# Altium PCB IMU Product.PcbDoc (part 2 of 2)
Units mil, origin at the board's own origin, x right, y up, seen from the top; angles counter-clockwise.
Board outline 944.97 x 945.36 mil, 4 copper layers (Top Layer, Layer 1, Layer 2, Bottom Layer), stack 62.63 mil thick; 58 components, 40 nets, 205 pads, 53 vias.
Unrouted connection lines stored in the file: 29.
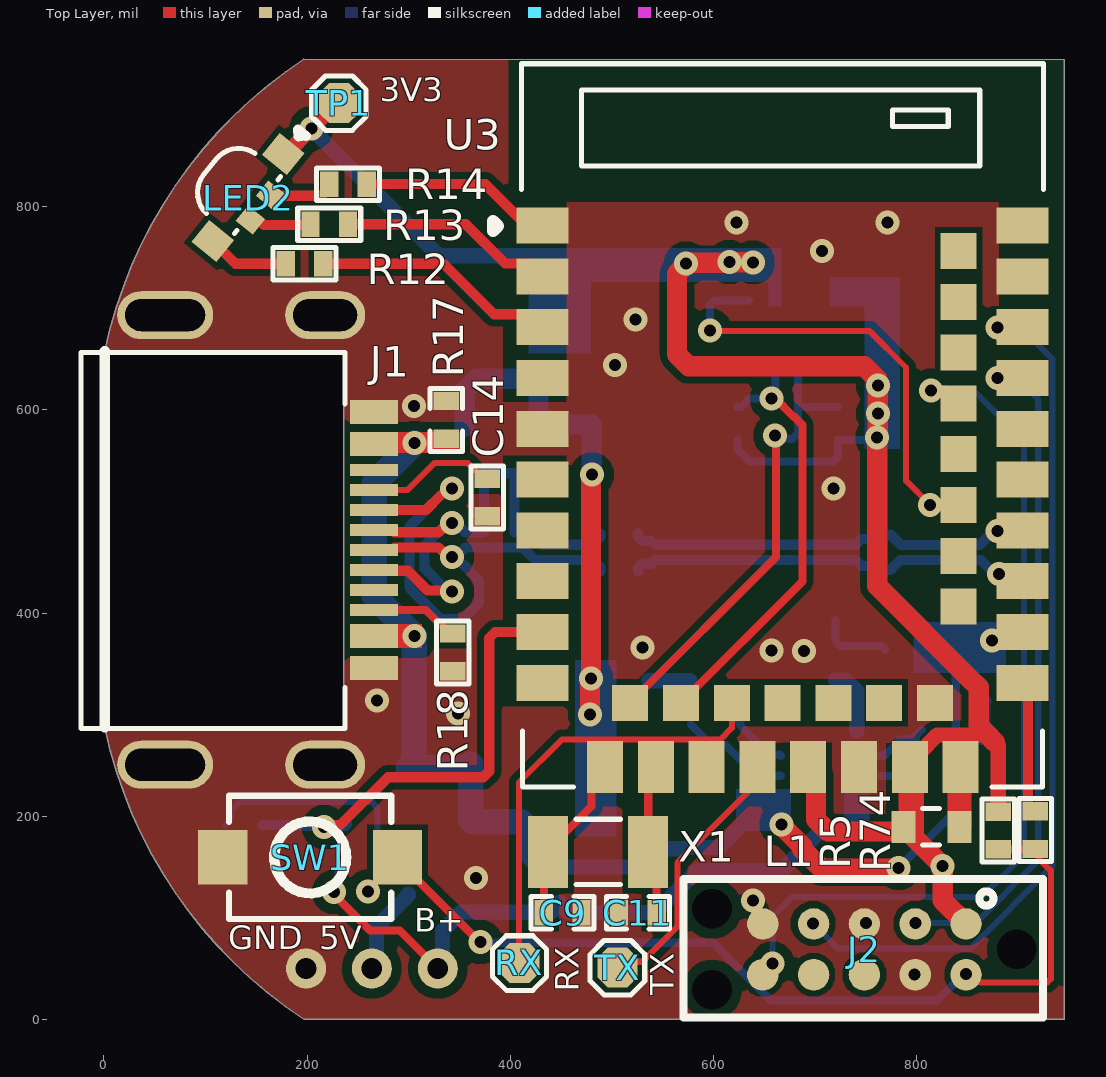
[diagram p0: Top Layer view]

## Part data (continued)
R20: library part RC0402FR-072KL, "RES 2K OHM 1% 1/16W 0402", Case Code (Imperial)=0402, Case Code (Metric)=1005, LCSC Part Number=C60488, Manufacturer=Yageo, Max Operating Temperature=155°C, Max Power Dissipation=63mW, Min Operating Temperature=-55°C, Package Quantity=1, Resistance Tolerance=1%, Resistor Type="Thick Film", Supplier Part Number=7970452, Temperature Coefficient=100ppm/°C, Voltage Rating=50V, Case/Package=0402, Category="Chip SMD Resistors", ComponentLink1Description=https://datasheet.ciiva.com/11808/0900766b80c66297-11808787.pdf?src-supplier=Rs, ComponentLink1URL=https://datasheet.ciiva.com/11808/0900766b80c66297-11808787.pdf?src-supplier=Rs, ComponentLink2Description=https://datasheet.ciiva.com/11808/0900766b80c66297-11808787.pdf?src-supplier=Rs, ComponentLink2URL=https://datasheet.ciiva.com/11808/0900766b80c66297-11808787.pdf?src-supplier=Rs, ComponentLink3Description=https://datasheet.ciiva.com/7849/1018594-7849934.pdf?src-supplier=Element14, ComponentLink3URL=https://datasheet.ciiva.com/7849/1018594-7849934.pdf?src-supplier=Element14, ComponentLink4Description=https://datasheet.ciiva.com/7849/1018594-7849935.pdf?src-supplier=Element14, ComponentLink4URL=https://datasheet.ciiva.com/7849/1018594-7849935.pdf?src-supplier=Element14, ComponentLink5Description=https://datasheet.ciiva.com/7983/1018594-7983517.pdf?src-supplier=Element14, ComponentLink5URL=https://datasheet.ciiva.com/7983/1018594-7983517.pdf?src-supplier=Element14, ComponentLink6Description=https://datasheet.ciiva.com/2453/pyu-r-int-thick-7-2453635.pdf?src-supplier=Digi-Key, ComponentLink6URL=https://datasheet.ciiva.com/2453/pyu-r-int-thick-7-2453635.pdf?src-supplier=Digi-Key, ComponentLink7Description=https://datasheet.ciiva.com/2453/pyu-r-int-thick-7-2453636.pdf?src-supplier=Digi-Key, ComponentLink7URL=https://datasheet.ciiva.com/2453/pyu-r-int-thick-7-2453636.pdf?src-supplier=Digi-Key, ComponentLink8Description=https://datasheet.ciiva.com/2453/pyu-r-int-thick-7-2453634.pdf?src-supplier=Digi-Key, ComponentLink8URL=https://datasheet.ciiva.com/2453/pyu-r-int-thick-7-2453634.pdf?src-supplier=Digi-Key, ComponentLink9Description=https://datasheet.ciiva.com/12667/pyu-rc0402-51-rohs-l-6-r-12667451.pdf?src-supplier=Mouser, ComponentLink9URL=https://datasheet.ciiva.com/12667/pyu-rc0402-51-rohs-l-6-r-12667451.pdf?src-supplier=Mouser, ComponentLink10Description=https://datasheet.ciiva.com/15189/getdatasheetpartid-358921-15189414.pdf?src-supplier=Verical, ComponentLink10URL=https://datasheet.ciiva.com/15189/getdatasheetpartid-358921-15189414.pdf?src-supplier=Verical, ComponentLink11Description=https://datasheet.ciiva.com/2453/pyu-r-int-thick-7-2453635.pdf?src-supplier=Digikey, ComponentLink11URL=https://datasheet.ciiva.com/2453/pyu-r-int-thick-7-2453635.pdf?src-supplier=Digikey, ComponentLink12Description=https://datasheet.ciiva.com/2453/pyu-r-int-thick-7-2453636.pdf?src-supplier=Digikey, ComponentLink12URL=https://datasheet.ciiva.com/2453/pyu-r-int-thick-7-2453636.pdf?src-supplier=Digikey, ComponentLink13Description=https://datasheet.ciiva.com/2453/pyu-r-int-thick-7-2453634.pdf?src-supplier=Digikey, ComponentLink13URL=https://datasheet.ciiva.com/2453/pyu-r-int-thick-7-2453634.pdf?src-supplier=Digikey, Construction=Rectangular, Depth=0.5mm, Features="Moisture Resistant", Height=0.016inch, Item Type=Resistor, Lead Free=5697LeadFree, Length=0.039inch, Manufacturer Part Number=RC0402FR-072KL, Military Standard=Not, Number of Terminations=2, Packaging="Tape and Reel", Power Rating=63mW, Pricing="10000=0.0018, 100000=0.0011, 200000=0.0017, 300000=0.001, 750000=0.0016, 2000000=0.0009, 2500000=0.0016, 10000000=0.0014 (USD)", Reach SVHC Compliant=Unknown, RoHS=Yes, RoHS Compliant=Yes, Series=RC, Stock=8530000, Supplier="Future Electronics", Technology="THICK FILM", Termination=SMD/SMT, Tolerance=1%, Voltage Rating (DC)=50V, Width=0.02inch, Working Voltage=50V
R74: library part RC0402FR-070RL, "RES 0 OHM JUMPER 1/16W 0402", Case Code (Imperial)=0402, Case Code (Metric)=1005, LCSC Part Number=C106231, Manufacturer=Yageo, Max Operating Temperature=155°C, Max Power Dissipation=63mW, Min Operating Temperature=-55°C, Power Rating=62.5mW, Resistor Type="Thick Film", Supplier Part Number 1=603-RC0402FR-070RL, Temperature Coefficient=200ppm/°C, Tolerance=1%, Voltage Rating=50V, Case/Package=0402, ComponentLink1Description=https://datasheet.ciiva.com/8896/pyu-rc0402-51-rohs-l-6-8896149.pdf?src-supplier=Avnet, ComponentLink1URL=https://datasheet.ciiva.com/8896/pyu-rc0402-51-rohs-l-6-8896149.pdf?src-supplier=Avnet, ComponentLink2Description=https://datasheet.ciiva.com/16790/pyu-rc0402-51-rohs-l-6-r-16790444.pdf?src-supplier=Future+Electronics, ComponentLink2URL=https://datasheet.ciiva.com/16790/pyu-rc0402-51-rohs-l-6-r-16790444.pdf?src-supplier=Future+Electronics, Contact Plating=Tin,Matte, Features="Moisture Resistant", Height=0.35mm, Item Type=Resistors, Lead Free="Lead Free", Length=1mm, Manufacturer Part Number=RC0402FR-070RL, Mount="Surface Mount", Number of Terminations=2, Packaging="Tape and Reel", Pricing 1="1=0.10000, 10=0.01400, 50=0.01400, 100=0.00600, 1000=0.00300, 5000=0.00200, 10000=0.00100 (USD)", Radiation Hardening=No, Resistance=0R, RoHS=Yes, RoHS Compliant=Yes, Series=RC, Size Code=0402, Stock 1=8556842, Supplier 1=Mouser, Termination=SMD/SMT, Width=0.5mm
RX TP1 TX: "Test Point ON", Item Type="Test Point", Manufacturer Part Number="TEST POINT 0.5mm Dia"
SW1: "Without bracket 50mA 4mm 100000 Times 12V 160gf 3mm 2mm Round Button Standing paste SPST SMD Tactile Switches ROHS", LCSC Part Number=C720477, Manufacturer=XUNPU, Package=SMD, ComponentLink1Description=LCSC, ComponentLink1URL=https://www.lcsc.com/product-detail/Tactile-Switches_XUNPU-TS-1088-AR02016_C720477.html?s_z=n_TS-1088-AR02016, Item Type="Tactile Switch", Manufacturer Part Number=TS-1088-AR02016
TP2 TP3 TP4: "Test pad"
U1: "IC BATTERY MANAGEMENT", LCSC Part Number=C3682876, Manufacturer="Texas Instruments", Item Type=IC, Manufacturer Part Number=BQ25170JDSGR, Pricing="1=0.8, 10=0.513, 50=0.513, 100=0.42, 1000=0.387, 10000=0.343 (USD)", RoHS=No, Stock=3618, Supplier=Mouser
U2: "SOT-23-5 Linear Voltage Regulators (LDO) ROHS", LCSC Part Number=C3021084, Manufacturer="TECH PUBLIC", Package=SOT-23-5, ComponentLink1Description=LCSC, ComponentLink1URL=https://www.lcsc.com/product-detail/Linear-Voltage-Regulators-LDO_TECH-PUBLIC-XC6210B332MR_C3021084.html, Item Type=IC, Manufacturer Part Number=XC6210B332MR
U3: "Bluetooth Modules ROHS", LCSC Part Number=C356849, Manufacturer="Chengdu Ebyte Elec Tech", Package=Custom, ComponentLink1Description=LCSC, ComponentLink1URL=https://www.lcsc.com/product-detail/Bluetooth-Modules_Chengdu-Ebyte-Elec-Tech-E73-2G4M08S1C_C356849.html?s_z=n_E73-2G4M08S1C, Item Type=Module, Manufacturer Part Number=E73-2G4M08S1C
U4: "INEMO 3D ACCELEROMETER AND 3D GY", LCSC Part Number=C5267406, Manufacturer=STMicroelectronics, Max Operating Temperature=85°C, Max Supply Voltage=3.6V, Min Operating Temperature=-40°C, Min Supply Voltage=1.71V, Height=860um, Item Type=IC, Manufacturer Part Number=LSM6DSV16XTR, Pricing="5000=2.815 (USD)", RoHS=No, Stock=5000, Supplier="Arrow Electronics"
X1: "32.768kHz Surface Mount Crystal 12.5pF ±20ppm SMD3215-2P Crystals ROHS", LCSC Part Number=C32346, Manufacturer=Epson, ComponentLink1Description=https://datasheet.octopart.com/Q13FC13500004-Epson-datasheet-62043850.pdf?src-supplier=Farnell, ComponentLink1URL=https://datasheet.octopart.com/Q13FC13500004-Epson-datasheet-62043850.pdf?src-supplier=Farnell, ComponentLink2Description=https://datasheet.octopart.com/Q13FC13500004-Epson-datasheet-32025749.pdf?src-supplier=Newark, ComponentLink2URL=https://datasheet.octopart.com/Q13FC13500004-Epson-datasheet-32025749.pdf?src-supplier=Newark, Item Type=Crystals, Manufacturer Part Number=Q13FC13500004, Reach SVHC Compliant=4187SVHC, RoHS=Yes, Stock=52665, Supplier=Farnell

## Via types
v1: diameter 23.62, hole 11.81, Top Layer to Bottom Layer, 53 vias

## Nets (pads, with @x,y where several pads share a name; then routed paths per layer and width w, separated by ;. In a path a pad name is that pad's centre, name@x,y a point inside that pad or via, vN(x,y) a via of type N, cw(c..) or ccw(c..) an arc to the next point about the centre after c; other vN are vias at no path point)
3V3: C5.2 C6.2 C15.1 C16.1 J2.1 L1.2 LED2.1 R5.2 R8.2 R9.2 R19.1 TP1.1 U2.5 U3.19 U3.23 U4.5 U4.8 | length 1985.5
  Top Layer w15: LED2.1 179.03,851.79 v1(204.05,876.82) 229.08,901.84 TP1.1 ; U3.23 793.2,252.57 810.11,269.48 810.11,270.1 819.89,279.88 860.91,279.88 867.79,279.88 868.91,281.01 ; 876.91,273.01 880.22,269.7 R5.2
  Top Layer w20: v1(572.98,743.92) 572.98,742.94 563.95,733.9 563.95,654.5 575.66,642.78 748.18,642.78 761.02,629.95 761.02,624.84 v1(761.71,624.15) v1(761.71,596.29) v1@761.71,575.85 ; v1@574.17,743.44 574.17,744.13 574.66,744.62 613.64,744.62 614.21,745.18 v1@636.17,745.18 ; U3.19 700.91,240.94 700.91,196.72 712.63,185 794,185 794,182.25 v1(825.48,150.77) ; v1(761.1,572.66) 761.1,426.62 851.72,336 860.91,326.8 860.91,289.01 868.91,281.01 876.91,273.01 ; v1@826.17,151.46 v1(825.48,150.77) ; J2.1 825.48,117.02 v1(825.48,150.77)
  Bottom Layer w8: R9.2 623.75,561.21 635.96,549 717.77,549 722.45,553.69 R8.2 762.55,570.21 771,578.66 771,587 v1(761.71,596.29) 764.64,599.22 764.64,621.22 v1(761.71,624.15) 767.49,629.93 767.49,642.19 771,645.7 ; v1@761.1,570.21 v1(761.1,572.66)
  Bottom Layer w10: 470.33,751.7 470.4,751.63 470.4,725.25 C5.2 C6.2
  Bottom Layer w15: v1(204.05,876.82) 329.18,751.7 470.33,751.7 ; 448.7,703.56 470.4,725.25 470.4,742.03 471.9,743.53 ; 721.44,723.2 723.44,721.2
  other v1: 615.47,745.46 638.67,745.18
+5V: D1.1 TP3.1 | length 88.1
  Bottom Layer w15: TP3.1 268.31,54.78 268.31,91.14 299.57,122.4 D1.1@299.57,123.38
BLUE_LED: R14.2 U3.1 | length 189.9
  Top Layer w10: R14.2 375.26,822.11 416.03,781.34 U3.1
D_N: J1.A7 J1.B7 R15.1 | length 551.9
  Top Layer w10: J1.A7 283.55,462.16 285.89,464.5 329.42,464.5 332.42,461.5 ; J1.B7 317.22,501.53 331.32,515.62
  Bottom Layer w10: v1(342.42,455.08) 346.11,455.08 355.47,464.45 382.41,464.45 412.17,464.45 424.4,452.22 472.4,452.22 472.82,451.79 476.11,448.5 484.9,448.5 488.9,444.5 R15.1 ; v1(342.4,522.81) 338.71,522.81 331.53,515.62 331.32,515.62 300.61,484.92 300.61,424.98 331.32,394.27 353.53,394.27 369.23,409.98 369.23,432.19 353.53,447.89
D_P: J1.A6 J1.B6 R16.1 | length 539.4
  Top Layer w10: J1.B6 266.74,441.56 299.25,441.56 318.73,422.08 v1@342.42,422.08 ; J1.A6 283.55,481.84 285.89,479.5 329.42,479.5 338.74,488.81 v1(342.42,488.81)
  Bottom Layer w10: v1(342.42,421.08) 339.81,423.69 335.9,423.69 315.61,443.98 315.61,466.19 331.32,481.89 331.82,481.89 338.74,488.81 v1(342.42,488.81) 346.11,488.81 355.47,479.45 369.23,479.45 374.23,479.45 374.23,537.54 404.23,537.54 404.23,479.45 417.75,479.45 418.38,479.45 430.61,467.22 472.4,467.22 476.11,470.93 484.9,470.93 488.9,474.93 R16.1
GND: C1.2 C2.2 C3.1 C4.1 C5.1 C6.1 C7.1 C8.2 C9.1 C10.1 C11.1 C12.1 C13.1 C14.1 C15.2 C16.2 J1.A1 J1.A12 J1.B1 J1.B12 J1.S1 J1.S2 J1.S3 J1.S4 J2.3 J2.5 J2.9 R1.1 R2.2 R3.1 R4.2 R11.1 R17.1 R18.1 SW1.1 TP4.1 U1.4 U1.9 U2.2 U3.5 U3.21 U3.24 U4.1 U4.2 U4.3 U4.6 U4.7 | length 26.9
  Top Layer w8: v1(639.03,116.98) 639.03,112.75 644.1,107.68 644.1,98.4 J2.5
  other v1: 797.55,44.37 750.3,94.89 366.21,139.23 348.72,300.91 268.66,313.71 657.27,363.13 689.16,362.77 529.9,366.08 718,522.68 305.05,603.77 502.95,643.96 523.28,688.78 706.86,756.53 622.61,784.53 771,784.53
GREEN_LED: R13.2 U3.2 | length 212.8
  Top Layer w10: R13.2 356.14,782.74 394.83,744.06 419.06,744.06 U3.2
INT1: R19.2 U3.32 U4.4 | length 418.9
  Top Layer w6: v1(596.4,678.27) 596.97,677.71 753.39,677.71 789.41,641.69 789.41,606.61 789.46,606.57 789.46,529.99 v1(813.1,506.34)
  Bottom Layer w8: R19.2 600.64,707.58 U4.4 ; R19.2 596.4,702.09 v1(596.4,678.27)
NetC3_2: C3.2 R20.1 | length 40.8
  Bottom Layer w15: C3.2 R20.1@576.86,333.28
NetJ1_A5: J1.A5 R17.2 | length 128.7
  Top Layer w6: J1.A5 298.82,521.21 325.23,547.62 358.16,547.62 373.66,532.12 R17.2
NetJ1_B5: J1.B5 R18.2 | length 87.3
  Top Layer w8: J1.B5 316.74,403.1 340.01,379.83 R18.2
NetL1_1: L1.1 U3.25
NetLED1_1: LED1.1 R6.1 | length 72.9
  Bottom Layer w8: LED1.1 720.2,372.23 724.89,367.54 765.16,367.54 R6.1
NetLED2_2: LED2.2 R14.1 | length 64.8
  Top Layer w10: LED2.2 164.65,810.66 213.83,810.66 221.78,818.61 R14.1
NetLED2_3: LED2.3 R13.1 | length 61.5
  Top Layer w10: LED2.3 152.58,786.81 157.57,781.82 202.34,781.82 R13.1
NetLED2_4: LED2.4 R12.1 | length 81
  Top Layer w10: LED2.4 129.56,743.75 R12.1
NetLED3_1: LED3.1 R7.1 | length 36.4
  Bottom Layer w15: LED3.1 864.92,278.63 864.92,312.22 R7.1@865.9,313.21
NetR1_2: R1.2 R20.2 U1.2 | length 116.4
  Bottom Layer w8: R20.2@577.66,290.08 597.85,269.9 611.84,269.9 625.84,255.9 627.02,255.9 631.02,251.9 631.02,239.8 U1.2
NetR2_1: R2.1 U1.7 | length 48.7
  Bottom Layer w8: U1.7@741.2,239.68 782.16,239.68 787.16,234.68 R2.1@787.16,234.06
NetR4_1: R4.1 U1.3 | length 65
  Bottom Layer w8: R4.1@618.42,297.08 621.34,297.08 626.34,292.08 626.34,289.17 655,260.5 665.28,260.5 U1.3
NetR74_1: R74.1 U3.26 | length 118.3
  Top Layer w10: U3.26 909.64,325.92 909.64,215.33
PG#: LED3.2 U1.6 | length 76.8
  Bottom Layer w8: U1.6 767.98,259.5 783.78,275.3 799.03,275.3 799.03,279.3 LED3.2@804.88,285.14
PWR_OR: C4.2 D2.2 Q1.2 U2.1 U2.3 | length 508.2
  Top Layer w20: v1(478.47,300.19) v1@478.47,334.81 ; v1@479.38,335.72 479.38,534.51 479.59,534.72 479.59,535.28 v1@479.38,535.49
  Bottom Layer w20: U2.3 354.99,619 366.71,630.72 415.94,630.72 427.66,619 427.66,585.25 U2.1 ; U2.1@431.62,575.54 429.81,577.35 U2.1 ; v1(480.28,536.4) 480.03,536.65 480.03,585.36 C4.2 431.62,585.62 429.81,583.81 U2.1 ; Q1.2@485.41,194.54 Q1.2@485.94,194 ; D2.2@485.41,250.49 484.87,251.03 D2.2@490.4,256.56
  other v1: 479.29,335.63
RED_LED: R12.2 U3.3 | length 241.7
  Top Layer w10: R12.2 334.25,743.75 383.94,694.06 419.06,694.06 U3.3
RESET: C7.2 J2.10 R5.1 R74.2 SW1.2 | length 1181.8
  Top Layer w6: v1(260.04,125.85) 260.04,127.97 SW1.2@289.02,156.94 ; v1(848.69,44.53) 854.73,44.53 862.89,36.37 928.53,36.37 932.04,39.89 932.04,146.43 920.14,158.33 920.14,161.83 R74.2@914.14,167.83
  Top Layer w8: SW1.2@289.02,156.94 369.59,76.37 v1(370.47,76.37) ; R5.1@880.22,167.02 880.62,167.43 913.74,167.43 R74.2@914.14,167.83
  Bottom Layer w6: C7.2 125.15,196.86 125.15,205.53 133.74,214.12 263.52,214.12 269.16,208.47 269.16,138.18 260.04,129.06 v1(260.04,125.85)
  Bottom Layer w8: v1(370.47,76.37) 371.39,75.45 599.47,75.45 656.37,18.56 819.92,18.56 845.89,44.53 v1(848.69,44.53)
RXD: RX.1 U3.16 | length 434.3
  Top Layer w6: RX.1 408.52,56.03 408.52,233.23 450.67,275.38 488.75,275.38 606.38,275.38 618,287 U3.16
SCL: R8.1 U3.12 U4.13 | length 453.3
  Top Layer w8: U3.12 661.62,455.28 661.62,573.86 v1(660.67,574.81)
  Bottom Layer w8: v1(660.67,574.81) 663.66,571.82 676.23,571.82 676.48,571.56 677.86,571.56 683.08,576.78 683.08,626.08 ; U4.13 683.08,639.43 683.08,626.88 ; 683.88,602.71 684.58,602.71 688.31,602.71 R8.1@722.45,602.71
SDA: R9.1 U3.14 U4.14 | length 436.9
  Top Layer w8: U3.14 687.43,431.09 687.43,585.26 679.16,593.53 678.45,593.53 661.01,610.97 v1(657.27,610.97)
  Bottom Layer w8: R9.1@623.75,602.71 627.25,602.71 635.52,610.97 660.72,610.97 662.35,612.6 660.91,614.04 660.91,641.92 U4.14
STAT: LED1.2 U1.5 | length 64.4
  Bottom Layer w15: LED1.2 730.05,334.18 741.05,323.18 741.05,284.2
SWCLK: J2.4 U3.39 | length 845.3
  Bottom Layer w6: v1(698.01,94.52) 722.45,70.08 852.94,70.08 933.57,150.71 933.57,650.43 903.19,680.81 v1(879.68,680.81)
SWDIO: J2.2 U3.37 | length 648
  Bottom Layer w6: v1@799.64,94.89 857.95,94.89 919.57,156.5 919.57,610.33 900.31,629.58 881.26,629.58 v1(879.5,631.34)
  other v1: 798.89,94.89
SWO: J2.6 U3.36 | length 870.1
  Top Layer w10: v1(814.22,618.89) 828.68,618.89 U3.36
  Bottom Layer w6: v1(657.96,54.91) 657.96,100.83 677.74,120.6 863.86,120.6 905.57,162.3 905.57,569.43 859.48,615.52 817.59,615.52 v1(814.22,618.89)
TXD: TX.1 U3.17 | length 264.2
  Top Layer w6: TX.1@506.98,51 512.72,56.74 529.99,56.74 564.4,91.14 564.4,154.11 643.2,232.91 U3.17
USB_D_N: C13.2 R15.2 U3.29 | length 375.6
  Bottom Layer w10: R15.2 525.9,444.5 529.9,448.5 538.68,448.5 542.39,452.22 739.89,452.22 745.87,446.24 766.32,446.24 C13.2 773.82,442.24 777.82,446.24 783.67,452.12 863.16,452.12 877.07,438.21 v1(880.75,438.21)
USB_D_P: C12.2 R16.2 U3.31 | length 374.3
  Bottom Layer w10: R16.2 525.9,474.93 529.9,470.93 538.68,470.93 542.39,467.22 739.89,467.22 745.67,473 767,473 C12.2 774.5,477 778.5,473 784.36,467.12 862.1,467.12 875.95,480.97 v1(879.63,480.97)
VBATT: C8.1 Q1.3 R10.2 TP2.1 U1.8 | length 691.5
  Top Layer w8: v1(226.43,125.33) 226.43,122.97 261.81,87.58 291.12,87.58 TP2.1
  Bottom Layer w8: v1@226.43,119.17 v1@232.59,125.33 ; v1(226.43,125.33) v1@232.59,125.33 ; v1@232.69,125.33 v1@232.59,125.33 ; R10.2 235.83,155.06 230.83,150.06 230.83,133.97 229.42,132.55 229.42,128.7 232.69,125.43 v1@232.59,125.33 ; TP2.1@328.58,43.97 TP2.1
  Bottom Layer w15: TP2.1 333.25,54.78 333.25,87.25 351.68,105.68 386.81,105.68 387.05,105.44 439.9,105.44 448.54,114.08 448.54,115.26 448.54,113.8 457.19,105.16 542.36,105.16 583.49,146.29 666.27,146.29 707.19,187.21 C8.1
VBATT_SENSE: C10.2 R10.1 R11.2 U3.9 | length 456.6
  Top Layer w10: v1(216.67,189.31) 218.67,191.3 232.59,191.3 279.72,238.43 373.38,238.43 379.24,244.29 379.24,375.48 385.1,381.34 U3.9
  Bottom Layer w10: C10.2 156.49,191.24 193.62,191.24 R11.2 194.81,190.35 215.63,190.35 v1(216.67,189.31) 218.05,190.68 237.96,190.68 R10.1
VBUS: C1.1 C2.1 C14.2 D1.2 D2.1 J1.A4 J1.A9 J1.B4 J1.B9 Q1.1 R3.2 R6.2 R7.2 U1.1 U3.27 | length 1222.3
  Top Layer w15: v1(873.93,372.77) 875.58,374.42 897.3,374.42 U3.27
  Top Layer w20: v1(666.81,192.08) 666.81,191.1 687.34,170.58 687.34,167.62 706.57,148.38 781.5,148.38 v1(782.19,149.08)
  Bottom Layer w8: v1(782.19,149.08) 838.39,205.28 838.39,362.14 842.33,366.08
  Bottom Layer w15: Q1.1 418.46,188.69 418.46,158.84 427.24,150.06 527.57,150.06 544.05,166.54 C2.1 549.05,168.04 572.72,168.04 573.97,169.29 605.71,169.29 632.02,195.6 C1.1
  Bottom Layer w25: v1(305.6,567.45) 266,527.85 266,416.88 v1(305.6,377.29) 305.6,268.24 304.79,267.44 304.79,252.61 D1.2@300.06,247.88 ; D2.1@357.7,247.88 D1.2@300.06,247.88 ; D2.1@360.85,251.03 360.85,196.35 362.81,194.39 Q1.1@410.75,194.39 ; D1.2@300.06,247.88 299.57,247.88 299.57,247.4 D1.2@300.06,247.88
XL1: C9.2 U3.11 X1.1 | length 147.3
  Top Layer w8: C9.2 432.96,160.67 X1.1 ; X1.1@450.79,180.75 479.87,209.83 479.87,235.34 U3.11
XL2: C11.2 U3.13 X1.2 | length 150.2
  Top Layer w8: U3.13 535.71,241.18 X1.2 543.98,156.73 C11.2
pads on no net: J1.A8 J1.B8 J2.7 J2.8 J2.MP1 J2.MP2 J2.MP3 U2.4 U3.4 U3.6 U3.7 U3.8 U3.10 U3.15 U3.18 U3.20 U3.22 U3.28 U3.30 U3.33 U3.34 U3.35 U3.38 U3.40 U3.41 U3.42 U3.43 U4.9 U4.10 U4.11 U4.12

## Polygon pours and split planes (outlines as drawn)
GND on Top Layer "GND_L01_P004" (solid, remove dead copper, pour order 4): 196.88,0 cw(c447.93,381.87) 0.76,287.58 235.84,287.58 235.84,657.66 0.03,657.66 0.76,657.66 cw(c447.93,563.37) 196.88,945.24 398,945.24 398,945.03 398,804.1 944.88,804.1 944.88,0
GND on Bottom Layer "GND_L04_P002" (solid, remove dead copper, pour order 2): 196.88,0 cw(c447.93,381.87) 0.76,287.58 235.84,287.58 235.84,657.66 0.03,657.66 0.76,657.66 cw(c447.93,563.37) 196.88,945.24 398,945.24 398,945.03 398,804.1 944.88,804.1 944.88,0

## Other copper
Top Layer:
  rectangle net NetL1_1: 830.31,189.5 853.9,228
  rectangle net VBUS: 242.22,365.69 313.23,389.33
  rectangle net VBUS: 242.22,557.63 350.29,578.3
  rectangle net 3V3: 782.19,173.75 807,266.38
Bottom Layer:
  rectangle net PWR_OR: 463.42,180.13 504.48,354
  rectangle net VBUS: 796.66,341.21 888,390.95
  rectangle net 3V3: 654.31,701.87 666.86,756.53
  rectangle net 3V3: 470.4,725.89 667.04,759.5
  rectangle net 3V3: 748.74,561.21 783.5,730.2
  rectangle net 3V3: 713.94,701.57 783.5,730.7
  region net VBUS: 676.09,227.02 621.92,227.02 621.92,185.51 676.09,185.51
  region net VBUS: 676.09,225.05 653.69,225.05 653.69,194 676.09,194
  region net VBATT: 753.52,225.08 728.55,225.08 728.55,178.21 753.52,178.21
  rectangle net 3V3: 418,655.42 479.4,751.7

## Silkscreen, mask and mechanical layers (free items; w line width, h text height)
Top Overlay:
  lines w10: 0.76,287.58 0.76,657.66
  text "3V3" at 271.29,895.77 h40
  text "B+" at 305.44,78.48 h40
  text "GND" at 122.12,61.33 h40
  text "5V" at 211.91,61.37 h40
  text "RX" at 475.21,27.3 h40 r90
  text "TX" at 568.92,23.94 h40 r90
Bottom Overlay:
  text "CHG" at 736.64,414.41 h40 r90
  text "PWR" at 841.62,307.27 h40
Board Outline:
  lines w10: 0.03,657.66 235.84,657.66 235.84,287.58 0.76,287.58 ; 196.99,945.12 945,944.76 945,-0.12
  lines w15: 0.76,287.58 ccw(c447.93,381.87) 196.88,0 944.88,0 944.88,804.1 398,804.1 398,945.03 ; 0.76,657.66 cw(c447.93,563.37) 196.88,945.24 398,945.24

## Dimensions
945,944.76 to 944.88,0 on Top Overlay
0.03,657.66 to 945,944.76 on Top Overlay